# Altium PCB 0.PCB1.PcbDoc (part 3 of 10)
Units mil, origin at the board's own origin, x right, y up, seen from the top; angles counter-clockwise.
Board outline 3897.64 x 3897.64 mil, 6 copper layers (Top Layer, Layer 1, Layer 3, Layer 4, Layer 2, Bottom Layer), stack 60.567 mil thick; 715 components, 563 nets, 2530 pads, 1442 vias.
Unrouted connection lines stored in the file: 6.
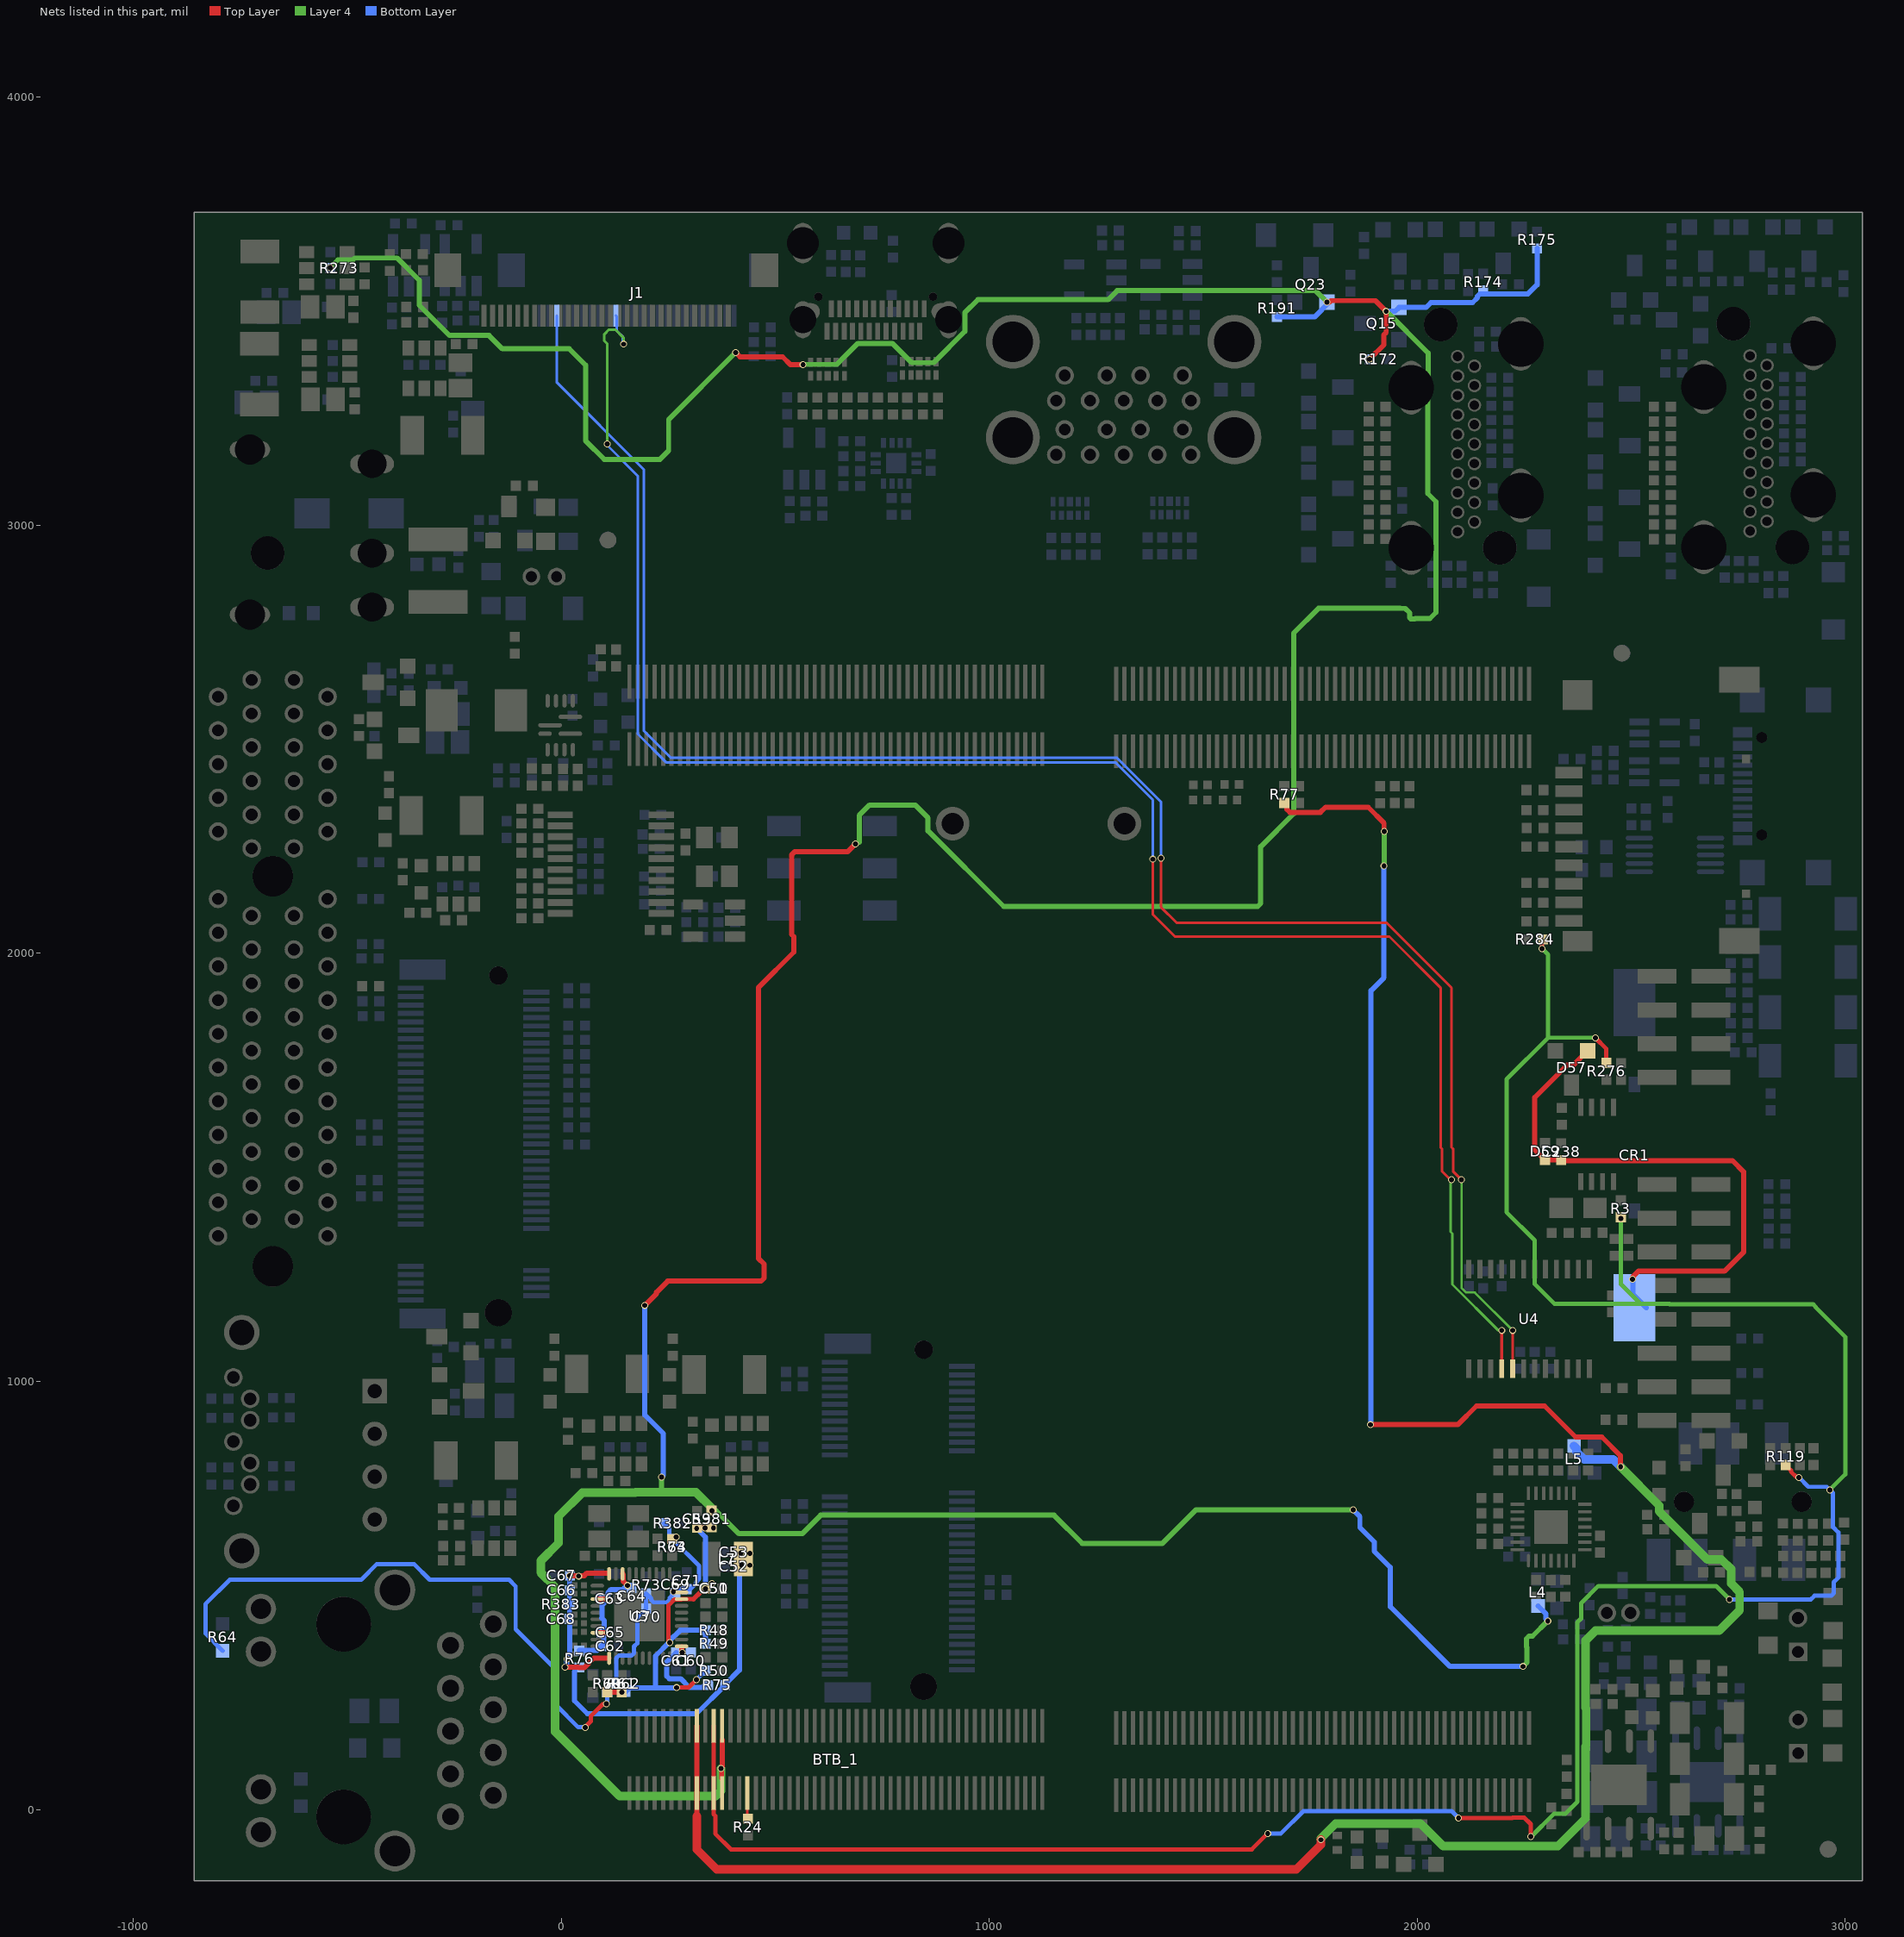
[diagram p6: the nets of this part, all layers, seen from the top]

## Part data (continued)
R1 R2 R3 R4 R5 R6 R7 R8 R9 R10 R11 R12 R13 R14 R15 R16 R17 R18 R19 R24 R25 R26 R27 R28 R29 R30 R31 R32 R33 R34 R35 R36 R (continued)
  R373 R374 R375 R376 R377 R378 R379 R380: PCB Footprint=R0201, 品牌=合科泰, 条码=EBF29070164, 生命周期=量产, 类别=贴片电阻0201, 规格="贴片电阻0R 1% 1/20W 0201", 规格书=合科泰-RI系列电阻.pdf, 规格编号=RI0201L0000FT
  R386: PCB Footprint=R0402, 品牌=厚声, 条码=EBF29070062, 生命周期=量产, 类别=贴片电阻0402, 规格="贴片电阻1M 1% 1/16W 0402", 规格书=合科泰-RI系列电阻.pdf, 规格编号=RI0402L1004FT
R20 R21 R22 R23: library part R, "贴片电阻", BOM名称=贴片电阻, 联系下单店铺卖家 免费帮你查找封装="联系下单店铺卖家 免费技术支持"
SW5: JLCPCB Part Class=扩展库, LCSC Part Name="两档立式贴片 6脚拨动 柄长2.0MM", Manufacturer="SHOU HAN(首韩)", Add into BOM=yes, Convert to PCB=yes, Datasheet=https://atta.szlcsc.com/upload/public/pdf/source/20190925/C431544_D32DFFD935A96A6C5145903882D4ABA1.pdf, Device=MST22D18G2, Manufacturer Part=MST22D18G2, Supplier=LCSC, Supplier Footprint=SMD,3.6x9.1mm, Supplier Part=C431544, Symbol=MST22D18G2
U1 U17 U25 U28 U31 U32 U43: library part TP6327GS6, PCB Footprint=SOT23_6, 可替代料=TP6327GS6, 品牌=安森德, 备注=RK3566金手指与BTB底板替换物料, 条码=EBFCIS240710113940, 生命周期=量产, 类别=电源管理-DCDC, 规格="DC-DC电源芯片 可输出电流 3A 开关工作频率 600kHz 输出类型 ADJ 输入电压范围：4V-18V", 规格书=安森德_ASP9135ZC-R.pdf, 规格编号=ASP9135ZC-R
U26: library part PI6C557-05BLE, PCB Footprint=tssop20, 品牌=锐星微, 备注=通用, 条码=EBFCIS240814173115, 生命周期=量产, 类别=时钟信号发生器, 规格="PCIe Gen 3 时钟发生器 输出通道：4通道 工作电压3.0~3.6V 输入频率：25MHz 最大输出频率：200MHz", 规格书=锐星微_RS2CG5705BLE.pdf, 规格编号=RS2CG5705BLE
U27: library part LDO_PT5108, PCB Footprint=SOT23-5, 价格=0.48864, 品牌=台舟, 条码=EBF29110067, 生命周期=量产, 类别=电源管理-LDO, 规格="低压差LDO 最高7V 输出3.3V 最大电流500mA 压差300mV@(200mA) 低噪声 高PSRR", 规格书=台舟TP5108E.pdf, 规格编号=TP5108E23E-33
U33 U34: library part 74LVC1G125, PCB Footprint=SOT-353, 丝印=VM, 价格=0.182409, 品牌=安世, 条码=EBF29170001, 生命周期=量产, 类别=隔离器件, 规格="时钟缓冲器 驱动器 具有三态输出 允许工作电压为3.3V 5.5V 典型工作电流100mA", 规格书=74LVC1G125GW.pdf, 规格编号=74LVC1G125GW
U35: library part HYM8563S, PCB Footprint=msop-8, 价格=0.8789, 品牌=捷茂微, 备注=鲁班猫系列板子, 条码=EBFCIS240229100017, 生命周期=量产, 类别=实时时钟芯片, 规格="工作电压1.5V~5.5V 日期格式YY-MM-DD 时间格式HH:MM:SS 接口类型I2C 电流消耗0.25uA~@3.0V", 规格书=捷茂微_BM8563EMA.pdf, 规格编号=BM8563EMA
Y2 Y4: library part CRYSTAL_4P, CLASS=IC, PCB Footprint=3225, 价格=0.385846, 品牌=扬兴科技, 条码=EBF29100005, 生命周期=量产, 类别="贴片晶振 3225", 规格="无源晶振25MHZ 50Ω 16pF 3225", 规格书=扬兴科技-25MHZ.pdf, 规格编号=X322525MQB4SI
Y5: library part CRYSTAL_2P, PCB Footprint=3215, 价格=2.57, 品牌=爱普生, 条码=EBF29100004, 生命周期=量产, 类别="贴片晶振 3215", 规格="无源晶振32.768KHz 70KΩ 9pF 3215", 规格书=爱普生-32.768KHz.pdf, 规格编号=Q13FC1350000300
D57: PCB Footprint=SOT23, 丝印=KL3, 价格=0.077486, 品牌=江苏长电, 条码=EBF29140062, 生命周期=量产, 类别=贴片肖特基二极管, 规格="肖特基双二极管 直流反向耐压(Vr) 30V 平均整流电流(Io) 300mA 正向压降(Vf) 1V@100mA", 规格书=江苏长电_BAT54C.pdf, 规格编号=BAT54C
J5: PCB Footprint=dc_in_th_3p_10r1x11r6, 条码=EBF29040093, 生命周期=量产, 类别=DC电源座, 规格="DC-044A-20A DC插座", 规格书=DC插座_内径_2MM外径_5.9MM.pdf, 规格编号="DC-044A-20A DC"
J7: PCB Footprint=HY911130A, 价格=11.12, 可替代料=EBF29040053, 品牌=汉仁, 条码=EBF29040053, 生命周期=量产, 类别=网口, 规格="屏蔽式以太网连接器RJ45 引脚数14 LED灯黄绿 1000M", 规格书="汉仁_1000M_ HY911130A.pdf", 规格编号=HY911130A
J9: PCB Footprint=USB3D0-AF-18P, 品牌=富士康, 条码=EBF29040092, 生命周期=量产, 类别=USB接口, 规格=USB3.0_USB2.0母座, 规格书=UEA1112C-UHS6-4F.pdf, 规格编号=UEA1112C-UHS6-4F
J11: PCB Footprint=audio_smd_7p_6r0x8r8, 品牌=品赞, 条码=EBF29040116, 生命周期=量产, 类别=耳机座, 规格=PJ-393_3.5MM四段式耳机插座_7pin, 规格书=PJ-393_3.5MM四段式耳机插座_7pin.pdf, 规格编号=PJ-393
J13: PCB Footprint=M2_NGFF_E_KEY, 品牌=LOTES, 备注="RK3588 LBC5 M2无线网卡连接器", 条码=EBFCIS230525165441, 生命周期=量产, 类别=金手指连接器, 规格="M.2 NGFF 高度5.5MM M.2 E KEY连接器 75PIN", 规格书=LOTES_APCI0317-P001A.pdf, 规格编号=APCI0317-P001A
J16 J17: CLASS=IO, OriginalSymbolOrigin=(-200,650), PCB Footprint=HDMI-SMD, Vendor=Comtek, VPN=1166-2C105-211, 品牌=讯普, 条码=EBF29040081, 生命周期=量产, 类别=HDMI连接器, 规格=HDMI立式, 规格书=HDMI-001C.pdf, 规格编号=HDMI-001C
J19: PCB Footprint=M2_NGFF_M_KEY, 条码=EBF29040083, 生命周期=量产, 类别=金手指连接器, 规格=M.2NGFF高度5.5MMM.2连接器镀金30UMKEY67PIN, 规格书=M.2NGFF-M-67PIN.pdf, 规格编号=M2_NGFF_M_KEY
J24: CLASS=IO, PCB Footprint=TFCARD, 价格=0.48, 可替代料=EBF29040003, 品牌=硕方, 条码=EBF29040003, 生命周期=量产, 类别=SD卡连接器, 规格="MICRO SD 卡座 TF T-Flash 外焊 双压片 自弹贴片", 规格书=硕方-TF-015.pdf, 规格编号=TF-015
J39: PCB Footprint=ssata_v, 品牌=华宇创, 条码=EBF29040076, 生命周期=量产, 类别=SATA连接器, 规格="SATA 7PIN 全包开窗 A型", 规格书=SATA_7PIN.pdf, 规格编号=HYCW01-SATA07-205B
P1: CLASS=IC, PCB Footprint=MIC2-4R00-TM, 价格=0.868384, 品牌=赢海, 条码=EBFCIS221130183008, 生命周期=量产, 类别=麦克风, 规格="4*1.2mm咪头 双电容驻极体话筒 拾音器 工作电压1.5V-10V 灵敏度-62DB 低阻抗", 规格书=赢海_GMI4015P-2C-62db.pdf, 规格编号=GMI4015P-2C-62db
Q6 Q7 Q8 Q9 Q10 Q11 Q12 Q13 Q14 Q15 Q16 Q17 Q18 Q19 Q20 Q21 Q22 Q23: CLASS=IC, PCB Footprint=SOT23, 丝印=KN, 价格=0.120725, 品牌=江苏长电, 条码=EBF29280009, 生命周期=量产, 类别=N-MOS, 规格="N沟道MOS 导通电阻8Ω 电流10mA 0.8V可驱动", 规格书=长电科技-2SK3018.pdf, 规格编号=2SK3018
U2: PCB Footprint=QFN12-2R00X3R00, 价格=3.2, 品牌=MPS, 条码=EBFCIS221112174800, 生命周期=量产, 类别=电源管理-DCDC, 规格="DC-DC电源芯片 输入：4.5V-26V 电流：8A 频率: 固定700KHz频率  FB：0.6V", 规格书=MPS_MP8759GD-Z.pdf, 规格编号=MP8759GD-Z
U3: PCB Footprint=qfp_40p_r, 价格=15.2, 品牌=瑞昱, 条码=EBF29150018, 生命周期=量产, 类别=以太网芯片, 规格="以太网芯片 10M/100M/1000M 控制接口：RGMII RGMII电压：3.3V/2.5V/1.8V/1.5V", 规格书=瑞昱_RTL8211F-CG.pdf, 规格编号=RTL8211F-CG
U4: PCB Footprint=TSSOP24-0R65-7R80X4R40, 丝印=XL9535D, 价格=1.75, 品牌=信路达, 备注="RK3588 BTB底板", 条码=EBFCIS230803102100, 生命周期=量产, 类别=IO拓展, 规格="I2C接口 16个双向输入输出引脚 支持中断输出 工作电压2.3V~5.5V", 规格书=信路达_XL9535.pdf, 规格编号=XL9535
U5: PCB Footprint=WQFN14-0R50-2R5X2R5EP1R45X1R45, 价格=3.8016, 品牌=安森美, 条码=EBFCIS221116112239, 生命周期=量产, 类别=USB芯片, 规格="可编程USB Type-C控制器 支持USB Type-C检测 带PD 可实现高达 100 W 的电源和角色互换", 规格书=安森美_FUSB302BMPX.pdf, 规格编号=FUSB302BMPX
U6 U7 U39 U40 U48: PCB Footprint=SOT23-5, 价格=0.468063, 品牌=微源半导体, 条码=EBF29280015, 生命周期=量产, 类别=功率开关, 规格="集成电源开关 导通电阻：80mΩ 最大可设置保护电流：2.1A 输入电压：2.5V~6V 静态电流：30uA 其他功能：软启动、短路保护、热保护", 规格书=微源半导体_LPW5209AB5F.pdf, 规格编号=LPW5209AB5F
U8 U9 U10 U11: PCB Footprint=USON_10, 价格=0.185957, 品牌=台舟, 条码=EBF29140046, 生命周期=量产, 类别=贴片四路ESD, 规格="TVS二极管 箝位电压17V 击穿电压8V 反向关断电压5V", 规格书=台舟-RCLAMP0524P.pdf, 规格编号=RCLAMP0524P
U16: PCB Footprint=qfn28_0r45-4x4EP2R6X2R6, 价格=3.904, 品牌=顺芯, 条码=EBFCIS221116105415, 类别=音频芯片, 规格="音频接口芯片 模拟供电1.7V~3.6V 核心与IO供电1.5V~3.6V", 规格书=顺芯_ES8388.pdf, 规格编号=ES8388
U42 U46: PCB Footprint=SOP-8-EP-2R5X3R4, 品牌=纳芯威, 备注=RK3566广告机, 条码=EBFCIS230518164803, 生命周期=量产, 类别=音频芯片, 规格="单声道AB/D类音频功率放大器 工作电压:6V~14V 输出功率:18W@4Ω 超低EMI 支持差分输入", 规格书=纳芯威_NS4110B音频功放.pdf, 规格编号=NS4110B

## Via types
v1: diameter 16.14, hole 11.81, Top Layer to Bottom Layer, tented both sides, 1434 vias
v2: diameter 16.14, hole 11.81, Top Layer to Bottom Layer, 8 vias

## Nets (pads, with @x,y where several pads share a name; then routed paths per layer and width w, separated by ;. In a path a pad name is that pad's centre, name@x,y a point inside that pad or via, vN(x,y) a via of type N, cw(c..) or ccw(c..) an arc to the next point about the centre after c; other vN are vias at no path point)
1V05_AVDD_PHY1: C62.1 C63.1 C64.1 C65.1 R76.2 U3.3 U3.8 U3.38 | length 312.9
  Top Layer w12: U3.8@84.46,412.74 84.64,412.92 108.55,412.92 v1(108.73,413.1) ; U3.3@84.46,491.48 84.7,491.24 108.27,491.24 v1(108.51,491) ; U3.38@143.52,550.54 144.94,549.12 144.94,533.18 154.89,523.24 v1(155.18,523.24)
  Bottom Layer w12: R76.2@42.3,371.48 84,371.48 C62.1@94.06,381.54 99.86,387.34 99.86,405.84 C65.1@100.56,406.54 ; C65.1@100.72,419.5 100.72,441.4 94.92,447.2 95.63,447.91 95.63,477 108.51,489.88 v1(108.51,491) 109.3,491.79 109.3,506.76 116.44,513.9 144.72,513.9 154.06,523.24 v1(155.18,523.24)
1V05_DVDD_PHY1: C60.1 C61.1 R75.1 U3.21 | length 179.2
  Top Layer w12: U3.21@282.21,379.57 282.21,367.69 v1(283,366.9)
  Bottom Layer w12: C61.1@268.7,366.58 246.9,344.78 246.9,311.28 252.76,305.42 278.98,305.42 298.97,285.43 330.05,285.43 R75.1@335.52,290.9 ; v1@283,366.59 v1(283,366.9)
1V05_PHY1: C52.1 C53.1 L7.2 R75.2 R76.1 | length 758.9
  Bottom Layer w12: R76.1@31.9,323.2 31.2,322.5 31.2,253.8 61.4,223.6 316.08,223.6 R75.2@383.08,290.6 ; R75.2@383.58,292.8 416.54,325.76 416.54,566.36 v1(421.16,570.98) ; v1(419.6,599.5) 421.08,600.98 C53.1@422.34,600.98
  other v1: 441.1,570.7 440.86,598.48
1V8_DVDD_PHY1: C50.1 C51.1 C59.1 R48.1 R49.1 R50.1 R61.1 R62.1 R70.1 R381.1 U3.28 | length 867.6
  Top Layer w10: v1(253.66,390.16) 250.94,392.88 250.94,477.2 264.55,490.81 280.65,490.81 U3.28@281.32,491.48 309.1,491.48 ; v1(269.7,284.7) 270.11,285.11 297.98,285.11 v1(316.39,303.5)
  Top Layer w12: R70.1@107.86,273.92 v1(141.56,273.92) ; 309.1,491.48 327.1,509.48 C50.1@332.66,509.48 ; v1(316.45,656.85) 317.61,658.01 318.61,658.01 335.82,658.02 v1(336.12,657.72) ; v1@336.89,658.01 337.2,657.7 337.86,658.36 350.54,658.36 R381.1@351.2,659.02
  Bottom Layer w10: v1(316.39,303.5) 316.39,303.59 R50.1@337.08,324.28
  Bottom Layer w12: v1(141.56,273.92) 141.81,274.17 149.95,274.17 159.71,283.93 220.4,283.93 ; v1(269.7,284.7) 268.93,283.93 220.4,283.93 ; v1(316.45,656.85) 337.1,636.21 v1(337.08,515.78) ; R49.1@337.08,387.28 R48.1@337.08,418.78 277.98,418.78 252.3,393.1 252.3,390.5 220.4,358.6 220.4,283.93
  other v1: 352.57,527.92 355.8,657.4
3V3_AVDD_PHY1: C66.1 C67.1 C68.1 R383.1 U3.11 U3.40 | length 424.3
  Top Layer w12: v1(9.12,332.6) 40.19,332.6 41.19,331.61 54.45,331.61 76.52,353.68 U3.11@112.02,353.68 ; v1(20.28,546.3) 20.78,545.8 40.3,545.8 v1(40.8,545.3) 41.59,546.09 53.96,546.09 60.07,552.21 U3.40@110.35,552.21
  Bottom Layer w12: v1(9.12,332.6) 9.12,333.72 12.79,337.4 12.79,350.98 v1(13.58,351.77) ; v1@13.4,351.92 19.8,358.32 19.8,454.82 19.52,455.1 19.52,478.6 19.52,512 19.52,545.54 v1(20.28,546.3)
3V3_DVDD_PHY1: C69.1 C70.1 C71.1 R63.1 R64.2 R69.1 R73.2 R74.2 R382.1 U3.29 | length 2040.7
  Top Layer w10: v1(56.37,191.45) 56.37,193.11 69.26,206 69.26,218.26 96.59,245.59 104.79,245.59 v1(105.97,246.77)
  Bottom Layer w10: R64.2@-790.7,370.8 -831.14,411.24 -831.14,479.86 -774.2,536.8 -467.1,536.8 -430.6,573.3 -343.6,573.3 -307.1,536.8 -121.7,536.8 -106.3,521.4 -106.3,421.1 -12.3,327.1 -12.3,244.24 39.87,192.07 55.75,192.07 v1(56.37,191.45) ; v1(105.97,246.77) 105.97,248.43 107.86,250.32 R69.1@107.86,273.92 128,294.06 128,297.09 128.66,297.75 128.66,353.53 134.52,359.39 164.36,359.39 170.22,365.24 170.22,380.72 177.66,388.16 177.66,448.46 C70.1@198.6,469.4 198.53,469.47 R73.2@198.53,504.75 ; R73.2@198.46,504.82 R73.2@198.53,504.75 ; R382.1@240.64,668.7 252.26,657.08 252.26,638.96 R74.2@259.06,632.16 293.64,597.58 293.92,597.58 322.1,569.41 322.1,538.35 316.28,532.54 316.28,529.5 301.3,514.52 279.46,514.52 277.26,512.32 269.66,512.32 C69.1@264.19,506.86 ; v1(262.26,508.46) 263.87,506.86 C69.1@264.19,506.86 ; R73.2@198.53,504.75 210.66,492.62 210.66,489.27 215.93,484 246.99,484 254.06,491.07 254.06,495.06 264.19,505.19 C69.1@264.19,506.86
  other v1: 268.76,636.18
AUTO_PWRON_EN: BTB_1.86 R24.1 | length 69.7
  Top Layer w6.16: R24.1@435.08,-31.54 BTB_1.86@435.08,38.17
BAT_RTC: C238.1 CR1.1 D57.1 D59.1 | length 1361.9
  Top Layer w12: D59.1@2302.1,1514.4 2301.52,1514.4 D59.1@2298.85,1517.07 ; C238.1@2335.5,1517.07 D59.1@2298.85,1517.07 ; C238.1@2335.5,1519.4 2339.5,1515.4 2736.8,1515.4 2762.4,1489.8 2762.4,1301.9 2717.8,1257.3 2516.68,1257.3 2503.76,1244.38 2503.76,1239.49 v1(2502.97,1238.7) ; D57.1@2397.9,1772.2 2364.47,1738.77 2349.83,1738.77 2274.4,1663.34 2274.4,1541.52 D59.1@2298.7,1517.22 D59.1@2298.85,1517.07
  Bottom Layer w12: v1(2502.97,1238.7) 2503.9,1237.77 2503.9,1203.67 CR1.1@2535.7,1171.87
CAM0_nRST: J1.22 U4.5 | length 4294.7
  Top Layer w6.16: v1(1401.74,2222.28) 1401.1,2221.64 1401.1,2108.19 1437.69,2071.6 1928.09,2071.6 2080.09,1919.6 2080.09,1546.9 2083.69,1543.3 2083.69,1490.9 v1(2103.59,1471) ; U4.5@2223.01,1029.66 v1(2223.01,1119.2)
  Layer 4 w5.61: v1(2103.59,1471) 2103.59,1218.61 2114.49,1207.71 2134.51,1207.71 v1(2223.01,1119.2)
  Bottom Layer w6.16: J1.22@-9.81,3489.66 -9.81,3333.21 193.4,3130 193.4,2519.89 256.7,2456.59 1298.58,2456.59 1401.1,2354.07 1401.1,2222.92 v1(1401.74,2222.28)
CAM0_PWDN: J1.15 U4.4 | length 4346
  Top Layer w6.16: v1(1382.2,2219.9) 1382.2,2090.9 1434,2039.1 1935,2039.1 2054.5,1919.6 2054.5,1546.9 2058.1,1543.3 2058.1,1490.9 2078,1471 v1(2079.77,1471) ; U4.4@2197.42,1029.66 v1(2197.42,1119.2)
  Layer 4 w5.61: v1(2079.77,1471) 2078,1469.23 2078,1349.38 2082,1345.37 2082,1226.6 2189.41,1119.2 v1(2197.42,1119.2)
  Layer 4 w6.16: v1(107.5,3189.6) 107.5,3424.1 101,3430.6 101,3446.4 111.2,3456.6 127.2,3456.6 145.7,3438.1 v1(145.7,3423.1)
  Bottom Layer w6.16: v1(107.5,3189.6) 107.5,3186.9 179.2,3115.2 179.2,2512.2 245.25,2446.15 1294.65,2446.15 1382.2,2358.6 v1(1382.2,2219.9) ; J1.15@127.99,3489.66 129.9,3487.75 129.9,3454.83 144.32,3440.41 144.32,3424.48 v1(145.7,3423.1)
CORE_VCC_1V8_S0: BTB_1.12 BTB_1.89 L4.1 Q15.1 Q23.1 R172.1 R174.1 R175.1 R191.1 R273.2 R381.2 | length 12677.9
  Top Layer w12: v1(195.6,1177.6) 222.71,1204.71 222.71,1208.11 249.03,1234.43 466.97,1234.43 474,1241.46 474,1274.3 461.5,1286.8 461.5,1920.6 543.6,2002.7 543.6,2039.2 538.4,2044.4 538.4,2230.17 545.43,2237.2 669.23,2237.2 687.43,2255.4 v1(687.9,2255.4) ; BTB_1.89@374.94,71.54 374.94,93.24 373.41,94.78 v1(373.41,95.9) 373.4,97.02 376.02,99.64 BTB_1.12@376.02,162.28 ; v1(407.8,3403.6) 418.1,3393.3 517.3,3393.3 535.1,3375.5 v1(565.18,3375.5) ; v1(1789.01,3521.54) 1795.29,3521.54 1798.49,3524.74 1902.41,3524.74 v1(1927.51,3499.64) 1927.51,3450.34 1922.11,3444.94 1922.11,3421.14 v1(1888.61,3387.64)
  Layer 4 w12: v1(-539.8,3601.8) -521.75,3619.85 -486.35,3619.85 -481.8,3624.4 -383.5,3624.4 -331.6,3572.5 -331.6,3514 -261,3443.4 -168.5,3443.4 -137.4,3412.3 18.9,3412.3 57,3374.2 57,3197.5 100.5,3154 231,3154 251.1,3174.1 251.1,3246.9 v1(407.8,3403.6) ; v1(234.6,776.2) 234.6,742.3 236.1,740.8 237.2,739.7 ; v1@354.7,697.5 362.3,697.5 415.4,644.4 563.3,644.4 606.46,687.56 1151.44,687.56 1217.2,621.8 1404.7,621.8 1482.7,699.8 v1(1850.5,699.8) ; v1(565.18,3375.5) 566.5,3375.5 566.7,3375.7 644.1,3375.7 693.3,3424.9 773.8,3424.9 819,3379.7 870,3379.7 943.1,3452.8 943.1,3496.5 973.5,3526.9 1277.9,3526.9 1299.1,3548.1 1762.45,3548.1 v1(1789.01,3521.54) ; 696.3,2259.7 696.3,2322.2 720.5,2346.4 827.2,2346.4 857.2,2316.4 857.2,2286.2 1033.9,2109.5 1627.47,2109.5 1634.5,2116.53 1634.5,2249.2 1711.4,2326.1 1711.4,2747.9 1769.5,2806 1960.5,2806 1960.73,2805.77 1972.09,2805.77 1982.67,2795.19 1982.67,2783.83 1984.93,2781.57 1994.87,2781.57 1995.5,2782.2 2029.7,2782.2 2043.7,2796.2 2043.7,3055.1 2024.8,3074 2024.8,3344.7 2025.4,3345.3 2025.4,3402.5 v1@1926.3,3501.6 ; v1(2247.2,334) 2256.3,343.1 2256.3,379.1 2255.21,380.19 2255.21,398.88 2261.13,404.8 2269.5,404.8 v1(2305.2,440.5)
  Layer 4 w20: v1(352.2,698.3) 352.2,703.7 315.1,740.8 236.1,740.8 174.4,740.8 173.4,739.8 49,739.8 -5.9,684.9 -5.9,622.7 -47.8,580.8 -47.8,553.5 -14.2,519.9 -14.2,252.47 -13.8,252.07 -13.8,181.75 136.44,31.51 361.69,31.51 373.41,43.23 v1(373.41,95.9)
  Bottom Layer w12: v1(195.6,1177.6) 195.6,921.6 238.6,878.6 238.6,780.2 v1(234.6,776.2) ; R191.1@1672.5,3486.66 1760.42,3486.66 Q23.1@1795.2,3521.44 ; v1(1850.5,699.8) 1866.1,684.2 1866.1,658.64 1899.8,624.94 1899.8,603.1 1937.1,565.8 1937.1,473.6 2076.7,334 v1(2247.2,334) ; v1(1927.51,3499.64) 1948.19,3499.64 Q15.1@1957.4,3508.84 2020.66,3508.84 2031.95,3520.14 2129.41,3520.14 2140.8,3531.52 2140.8,3534.76 2146.67,3540.64 2258.81,3540.64 2280,3561.83 R175.1@2280,3646.66 ; L4.1@2282.4,475.3 2300.76,456.94 2300.76,444.94 v1(2305.2,440.5)
CORE_VCC_1V8_S3: BTB_1.11 BTB_1.90 R3.1 R119.1 R276.1 R284.1 | length 6293.8
  Top Layer w10: BTB_1.11@356.34,195.65 BTB_1.90@356.34,38.17 356.34,-10.8 359.97,-14.43 359.97,-56.67 396.5,-93.2 1613.5,-93.2 v1(1650.7,-56) ; v1(2096.6,-20.1) 2222.3,-20.1 2223.5,-18.9 2250,-18.9 2265.3,-34.2 2265.3,-62.93 v1(2265.6,-63.23) ; v1(2291.7,2010.8) 2291.7,2030.14 R284.1@2294.26,2032.7 ; v1(2416.2,1802.53) 2416.3,1802.53 2442,1776.83 R276.1@2442,1744.26 ; R119.1@2860.91,804.64 2873.31,792.24 2873.31,789.11 v1@2885.54,776.88
  Layer 4 w10: v1(2265.6,-63.23) 2266.27,-63.23 2319.2,-10.3 2345.89,-10.3 2374.25,18.05 2374.25,437.35 2383,446.1 2383,481.7 2423.2,521.9 2698.3,521.9 v1(2729.4,490.8) ; v1(2291.7,2010.8) 2305.8,1996.7 2305.8,1803 ; v1(2416.2,1802.53) 2415.73,1803 2305.8,1803 ; v1(2475.7,1380.83) 2475.7,1227.34 2522.14,1180.9 ; v1(2963.9,746.6) 3000.2,782.9 3000.2,1104 2930.6,1173.6 2930.6,1174.54 2924.74,1180.4 2785.74,1180.4 2785.57,1180.23 2771.43,1180.23 2771.26,1180.4 2590,1180.4 2589.5,1180.9 2522.14,1180.9 ; 2305.8,1803 2208.71,1705.91 2208.71,1395.19 2274.7,1329.2 2274.7,1227.2 2321,1180.9 2522.14,1180.9
  Bottom Layer w10: v1(1650.7,-56) 1681.8,-56 1733.7,-4.1 1990.7,-4.1 1990.9,-3.9 2080.4,-3.9 v1(2096.6,-20.1) ; v1(2729.4,490.8) 2919.8,490.8 2928.3,499.3 2967.34,499.3 2973.2,505.16 2973.2,531.1 2983.8,541.7 2983.8,647.4 2971.1,660.1 2971.1,739.4 v1(2963.9,746.6) 2956.7,753.8 2913.7,753.8 v1(2891.8,775.7)
CORE_VCC_3V3_S0: BTB_1.9 BTB_1.92 L5.1 R77.1 | length 6259.5
  Top Layer w12: 316.97,-15.43 BTB_1.92@316.97,38.17 BTB_1.9@316.97,195.65 ; R77.1@1689.57,2351.3 1695.37,2345.5 1695.37,2336.43 1702.58,2329.22 1773.75,2329.22 1785.63,2341.1 1885.68,2341.1 1922.51,2304.27 1922.51,2285.69 v1(1923.3,2284.9) ; v1(1891.1,898.9) 2094.7,898.9 2138.5,942.7 2297.5,942.7 2370.1,870.1 2431.4,870.1 2474.88,826.62 2474.88,799.92 v1@2475.4,799.4
  Top Layer w20: 316.97,-15.43 316.97,-93.57 363.4,-140 1717.6,-140 1775.1,-82.5 v1(1775.1,-70.7)
  Layer 4 w12: v1(1922.4,2204.2) 1923.3,2205.1 v1(1923.3,2284.9)
  Layer 4 w20: v1(1775.1,-70.7) 1775.1,-67.3 1809.5,-32.9 2008.1,-32.9 2060.5,-85.3 2328.9,-85.3 2393.25,-20.95 2393.25,147.25 2394.7,148.7 2394.7,236.23 2393.54,237.38 2393.54,394.44 2416.7,417.6 2705.4,417.6 2753.2,465.4 2753.2,508.2 2733.27,528.13 2733.27,561.66 2710.54,584.4 2677.7,584.4 2565.6,696.5 2565.6,710.33 v1(2475.38,800.55)
  Bottom Layer w12: v1(1891.1,898.9) 1892.2,900 1892.2,1913 1922.4,1943.2 v1(1922.4,2204.2)
  Bottom Layer w20: L5.1@2366.27,849.46 2372.02,843.71 2372.02,835.58 2389.9,817.7 2458.23,817.7 v1(2475.38,800.55)